# EAGLE board Klink_Dev_Board (EAGLE 9.7.0)
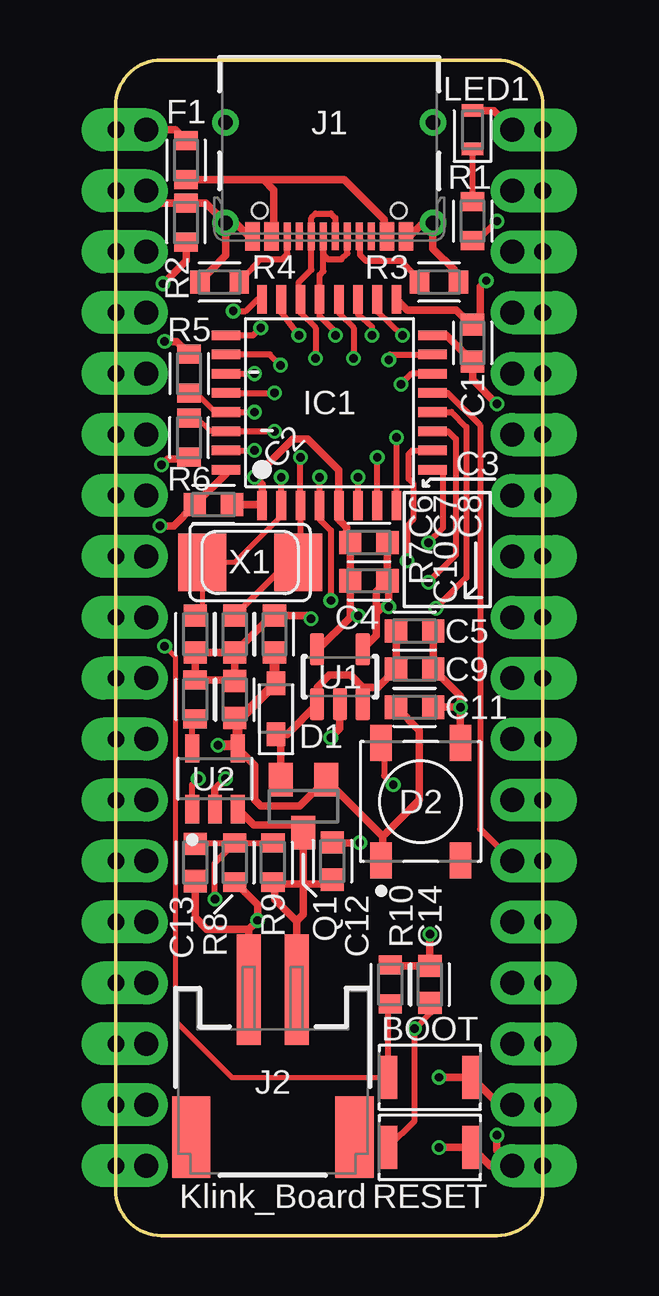
[diagram p0: board, top side]
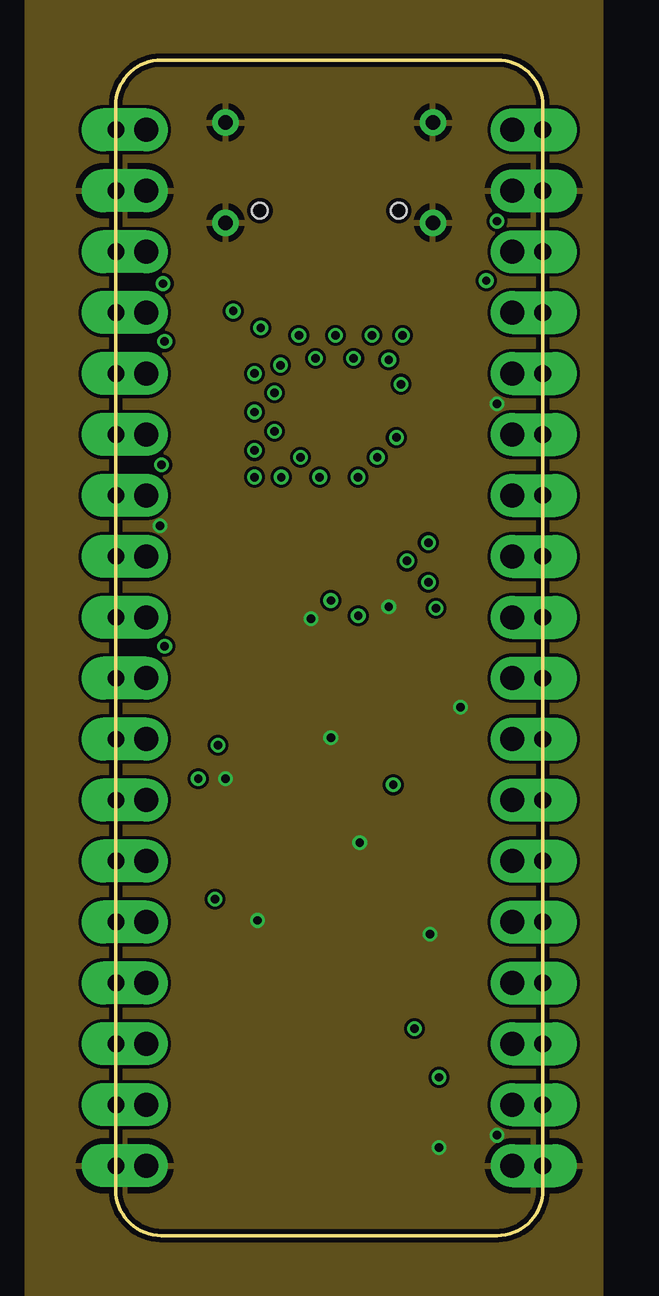
[diagram p1: board, inner layer Route2]
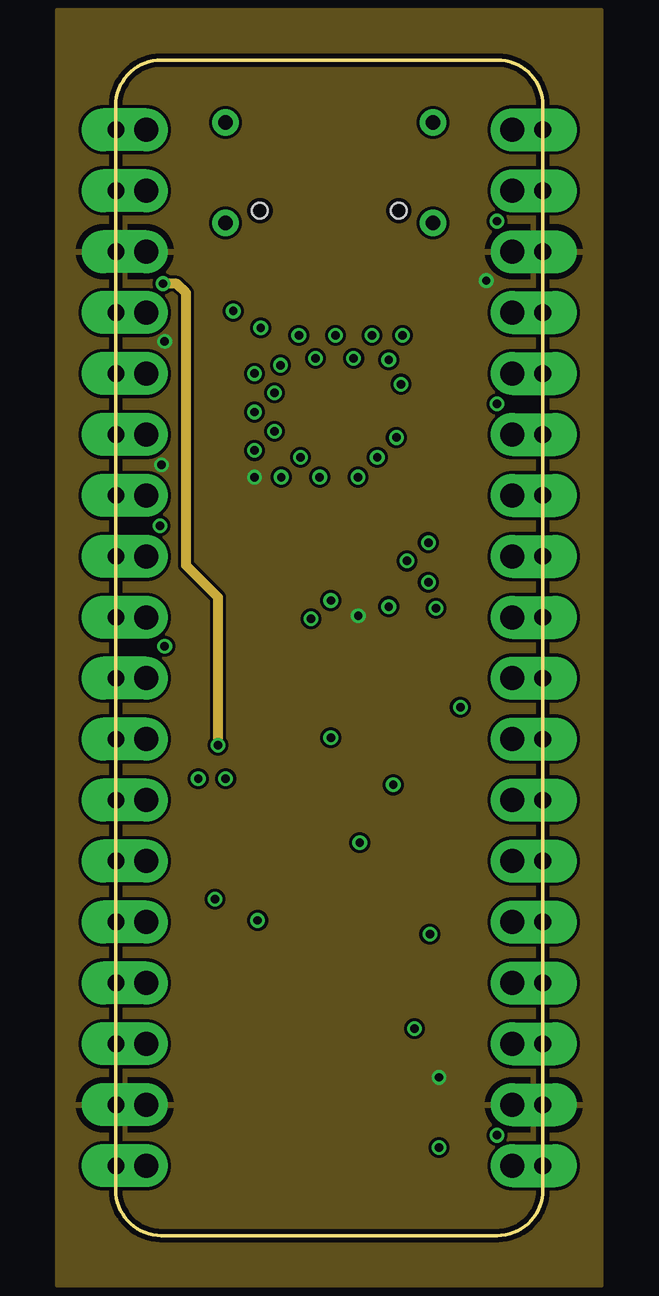
[diagram p2: board, inner layer Route15]
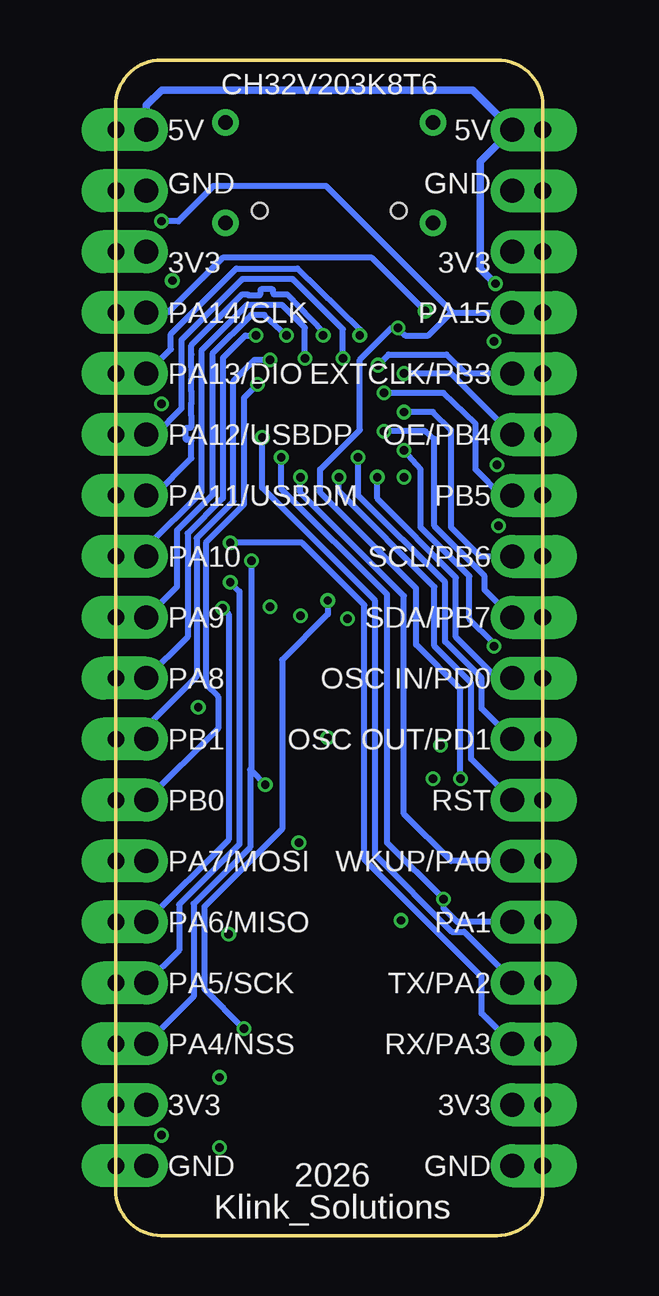
[diagram p3: board, bottom side, seen from below]

Size 17.8 x 49 mm. Coordinates in mm from the lower left corner, seen from the top.
Outline: 0,1.9 arc90 1.9,0 15.9,0 arc90 17.8,1.9 17.8,47.1 arc90 15.9,49 1.9,49 arc90 0,47.1 0,1.9
Copper layers (1+2*15+16): Top 0.035mm / dielectric 0.2mm / Route2 0.0175mm / dielectric 1.065mm / Route15 0.0175mm / dielectric 0.2mm / Bottom 0.035mm
Design rules "jlcpcb-4layers.dru": minimum track width 3.5mil, minimum drill 0.2mm, track to track 5mil, track to pad 0.2mm, pad to pad 5mil, via to via 0.5mm, smd to smd 5mil, copper to edge 0.2mm, drill to drill 6mil, minimum pad ring 10mil, minimum via ring 0.13mm, stop-mask expansion 0.05mm, vias tented up to drill 16mil, thermal gap 10mil

## Footprints (pad centres in the part's own frame; a part is rotated, then mirrored left to right if it is on the bottom)
B3U-1000P(M) = smd 0.8 x 1.8: 1 -1.75,0; 2 1.75,0
CAPC1608X85 = smd 0.921 x 0.97: 1 -0.775,0; 2 0.775,0
SODFL2513X70 = smd 0.985 x 0.774: 1 -1.065,0; 2 1.065,0
WS2812B = smd 1.5 x 0.9: 1 -2.45,1.65; 2 -2.45,-1.65; 3 2.45,-1.65; 4 2.45,1.65
FUSC1608X60N = smd 0.799 x 0.974: 1 -0.815,0; 2 0.815,0
LQFP32-7X7 = smd 1.2 x 0.4: 1 -4.3,2.8; 2 -4.3,2; 3 -4.3,1.2; 4 -4.3,0.4; 5 -4.3,-0.4; 6 -4.3,-1.2; 7 -4.3,-2; 8 -4.3,-2.8; 17 4.3,-2.8; 18 4.3,-2; 19 4.3,-1.2; 20 4.3,-0.4; 21 4.3,0.4; 22 4.3,1.2; 23 4.3,2; 24 4.3,2.8 | smd 0.4 x 1.2: 9 -2.8,-4.3; 10 -2,-4.3; 11 -1.2,-4.3; 12 -0.4,-4.3; 13 0.4,-4.3; 14 1.2,-4.3; 15 2,-4.3; 16 2.8,-4.3; 25 2.8,4.3; 26 2,4.3; 27 1.2,4.3; 28 0.4,4.3; 29 -0.4,4.3; 30 -1.2,4.3; 31 -2,4.3; 32 -2.8,4.3
629722000214 = smd 0.3 x 1.15: A1 -3.35,4.745; A4 -2.55,4.745; A5 -1.25,4.745; A6 -0.25,4.745; A7 0.25,4.745; A8 1.25,4.745; A9 2.55,4.745; A12 3.35,4.745; B1 3.05,4.745; B4 2.25,4.745; B5 1.75,4.745; B6 0.75,4.745; B7 -0.75,4.745; B8 -1.75,4.745; B9 -2.25,4.745; B12 -3.05,4.745 | drill 0.6 pad 1 slot 1.7 rotated 90: S1 -4.32,4.18; S2 4.32,4.18 | drill 0.6 pad 1 slot 1.4 rotated 90: S3 -4.32,0; S4 4.32,0 | hole 0.65: -2.89,3.68; 2.89,3.68
S2B-PH-SM4-TB = smd 4.6 x 1: 1 -3.84,1; 2 -3.84,-1 | smd 3.4 x 1.6: NC1 2.3,3.4; NC2 2.3,-3.4
LEDC1608X39N_R = smd 0.512 x 0.912: 1 -0.8,0; 2 0.8,0
SOT23 = smd 1 x 1.4: 1 -0.95,-1.1; 2 0.95,-1.1; 3 0,1.1
RESC1608X60 = smd 0.799 x 0.974: 1 -0.815,0; 2 0.815,0
SOT-23-5 = smd 1.32 x 0.59: 1 -1.145,0.95; 2 -1.145,0; 3 -1.145,-0.95; 4 1.145,-0.95; 5 1.145,0.95
SOT95P280X110-5 = smd 1.179 x 0.572: 1 -1.264,0.95; 2 -1.264,0; 3 -1.264,-0.95; 4 1.264,-0.95; 5 1.264,0.95
HYBRID_THROUGH_HOLE = drill 1 pad 1.7 offset: 0 -7.62,21.59; 1 -7.62,19.05; 2 -7.62,16.51; 3 -7.62,13.97; 4 -7.62,11.43; 5 -7.62,8.89; 6 -7.62,6.35; 7 -7.62,3.81; 8 -7.62,1.27; 9 -7.62,-1.27; 10 -7.62,-3.81; 11 -7.62,-6.35; 12 -7.62,-8.89; 13 -7.62,-11.43; 14 -7.62,-13.97; 15 -7.62,-16.51; 16 -7.62,-19.05; 17 -7.62,-21.59; 18 7.62,-21.59; 19 7.62,-19.05; 20 7.62,-16.51; 21 7.62,-13.97; 22 7.62,-11.43; 23 7.62,-8.89; 24 7.62,-6.35; 25 7.62,-3.81; 26 7.62,-1.27; 27 7.62,1.27; 28 7.62,3.81; 29 7.62,6.35; 30 7.62,8.89; 31 7.62,11.43; 32 7.62,13.97; 33 7.62,16.51; 34 7.62,19.05; 35 7.62,21.59
NX5032 = smd 2 x 2.4: P$1 2,0; P$2 -2,0

## Placement (x,y rotation side)
BOOT  B3U-X000B3U-1000P(M)1000P(M)  [B3U-1000P(M)]  13.09,6.59 0 top
C1  0.1uF  [CAPC1608X85]  14.87,37.2 90 top
C2  0.1uF  [CAPC1608X85]  4.07,30.47 0 top
C3  0.1uF  [CAPC1608X85]  10.55,28.88 0 top
C4  2.2uF  [CAPC1608X85]  10.55,27.29 180 top
C5  2.2uF  [CAPC1608X85]  12.46,25.2 180 top
C6  18pF  [CAPC1608X85]  3.31,25.07 270 top
C7  18pF  [CAPC1608X85]  4.96,25.07 270 top
C8  0.1uF  [CAPC1608X85]  6.61,25.07 270 top
C9  2.2uF  [CAPC1608X85]  12.46,23.61 180 top
C10  4.7uF  [CAPC1608X85]  4.96,22.34 90 top
C11  0.1uF  [CAPC1608X85]  12.46,22.02 180 top
C12  4.7uF  [CAPC1608X85]  9.03,15.61 90 top
C13  0.1uF  [CAPC1608X85]  3.31,15.55 90 top
C14  0.1uF  [CAPC1608X85]  13.09,10.47 90 top
D1  DIODE_DO-219-AC(SOD323F)  [SODFL2513X70]  6.68,21.96 90 top
D2  WS2812B  [WS2812B]  12.71,18.09 90 top
F1  FUSE_CHIP-0603(1608-METRIC)  [FUSC1608X60N]  2.93,44.82 90 top
IC1  CH32V203K8T6LQFP32  [LQFP32-7X7]  8.9,34.72 90 top
J1  629722000214  [629722000214]  8.9,46.39 180 top
J2  S2B-PH-SM4-TB  [S2B-PH-SM4-TB]  6.55,6.4 270 top
LED1  LED-RED  [LEDC1608X39N_R]  14.87,46.09 90 top
Q1  PMOSFET_SOT23-GSD  [SOT23]  7.82,17.9 180 top
R1  220  [RESC1608X60]  14.87,42.28 90 top
R2  100k  [RESC1608X60]  2.93,42.22 270 top
R3  5.1k  [RESC1608X60]  13.47,39.74 0 top
R4  5.1k  [RESC1608X60]  4.33,39.74 0 top
R5  4.7k  [RESC1608X60]  3.06,35.93 90 top
R6  4.7k  [RESC1608X60]  3.06,33.26 270 top
R7  10K  [RESC1608X60]  3.31,22.34 270 top
R8  1M  [RESC1608X60]  4.96,15.55 90 top
R9  1M  [RESC1608X60]  6.55,15.55 90 top
R10  4.7k  [RESC1608X60]  11.44,10.47 270 top
RESET  B3U-X000B3U-1000P(M)1000P(M)  [B3U-1000P(M)]  13.09,3.67 180 top
U1  TLV75733PDBVRDBV0005A_N  [SOT-23-5]  9.34,23.29 90 top
U2  MCP73831T-2ACI/OT_SOT23-5  [SOT95P280X110-5]  4.14,19.04 90 top
U$1  KLINK_BAORDHYBRID_THROUGH_HOLE  [HYBRID_THROUGH_HOLE]  8.9,24.5 0 top
X1  8mHz  [NX5032]  5.6,28.06 0 top

## Library data of the parts
BOOT RESET = Switch; CATEGORY: Switches; DATASHEET: https://omronfs.omron.com/en_US/ecb/products/pdf/en-b3u.pdf; DESCRIPTION: Tactile Switch SPST-NO Top Actuated Surface Mount; MANUFACTURER: Omron Electronics Inc-EMC Div; MPN: B3U-1000PM; OPERATING_TEMPERATURE: -25°C ~ 70°C; PACKAGE_SIZE: NA; PACKAGE_TYPE: SMD; PART_STATUS: ACTIVE; ROHS: COMPLIANT; SERIES: B3U; SUBCATEGORY: Tactile Switches; TYPE: SPST-NO
C1-C14 = Capacitor; CATEGORY: Capacitor; PACKAGE_SIZE: 0603; PACKAGE_TYPE: Surface Mount; SUBCATEGORY: Ceramic Capacitors; TYPE: MLCC
D1 = Diode; CATEGORY: Diode; DESCRIPTION: Generic diode Surface Mount DO-219-AC(SOD323F); PACKAGE_SIZE: SOD323F; PACKAGE_TYPE: Surface Mount; SUBCATEGORY: Rectifiers
D2 = LED; CATEGORY: LED; COLOR: RGB; DATASHEET: https://cdn-shop.adafruit.com/datasheets/WS2812B.pdf; DESCRIPTION: RGB LED chip 5050 Package; MANUFACTURER: Worldsemi; MPN: WS2812B; OPERATING_TEMPERATURE: -55°C ~ 150°C; PACKAGE_SIZE: 5050; PACKAGE_TYPE: Surface Mount; PART_STATUS: Active; ROHS: Compliant; SERIES: WS2812B; SUBCATEGORY: Chip LED Addressable; TYPE: Square with Flat Top
F1 = Circuit-Protection; CATEGORY_L1: Circuit Protection; CATEGORY_L2: Fuses; CATEGORY_L3: Board Mount (Cartridge Style Excluded); PACKAGE: Surface Mount; PACKAGE_SIZE: 0603
IC1 = WCH CH32V203
J1 = Wurth_Connectors_WR-USB; APPLICATION: USB 2.0; DATASHEET: https://www.we-online.com/redexpert/spec/629722000214?ae; GERDER: Receptacle; INTERFACE-TYPE: Type C; IR: 5 A; MOUNT: SMT; PACKAGING: Tape and Reel; PART-NUMBER: 629722000214; PCB-THICKNESS: 0.8 mm; PINS: 16pcs; TYPE: Horizontal; WORKING-VOLTAGE: 48 V (DC)
J2 = Connector; CATEGORY_L1: Connectors; CATEGORY_L3: Right Angle; DATASHEET: https://www.jst-mfg.com/product/pdf/eng/ePH.pdf; DESCRIPTION: Connector Header Surface Mount Right Angle 2 position 0.079" (2.00mm); MANUFACTURER: JST Sales America Inc.; MPN: S2B-PH-SM4-TB; OPERATING_TEMPERATURE: -25°C ~ 85°C; PACKAGE: Surface Mount; PACKAGE_SIZE: NA; PART_STATUS: Active; PITCH: 0.079" (2.00mm); ROHS: Compliant; SERIES: PH
LED1 = Tutorial - Fusion 360; CATEGORY: Opto-Electronic; COLOR: Red; SUB-CATEGORY: LED
Q1 = Transistor; CATEGORY: Transistor; DATASHEET: https://www.analog.com/media/en/package-pcb-resources/package/pkg_pdf/ltc-legacy-sot-23/sot3%2005-08-1631%20rev%20d.pdf; DESCRIPTION: Generic P-Channel MOSFET Surface Mount SOT23 Package; PACKAGE_SIZE: SOT23; PACKAGE_TYPE: Surface Mount; SUBCATEGORY: MOSFET; TYPE: P-Channel
R1-R10 = Resistor; CATEGORY: Resistors; DESCRIPTION: Chip Resistor 1.60 X 0.82 X 0.60 mm body 0603(1608-METRIC) Package; PACKAGE_SIZE: 0603; PACKAGE_TYPE: Surface Mount
U1 = 2026-07-09_23-18-33_Library; DATASHEET: https://www.ti.com/lit/gpn/tlv757p; TYPE: TYPE
U2 = IC_Power-Management; CATEGORY_L1: Power Management IC; CATEGORY_L2: Battery Chargers; CATEGORY_L3: Lithium Ion/Polymer; DATASHEET: https://ww1.microchip.com/downloads/en/DeviceDoc/MCP73831-Family-Data-Sheet-DS20001984H.pdf; DESCRIPTION: Charger IC Lithium Ion/Polymer SOT-23-5; INPUT_VOLTAGE: 6V; MANUFACTURER: Microchip Technology; MPN: MCP73831T-2ACI/OT; OPERATING_TEMPERATURE: -40°C ~ 85°C; OUTPUT_CURRENT: 500mA; OUTPUT_VOLTAGE: 4.2V; PACKAGE: Surface Mount; PACKAGE_SIZE: SOT-23-5; PART_STATUS: Active; ROHS: Compliant; SERIES: MCP73831; THERMALLOSS: 1.54 W; TOPOLOGY: NA
U$1 = Klink Board
X1 = adafruit

## Nets
BOOT: BOOT.1 IC1.31 R10.2
EXTCLK: IC1.26 U$1.4
GND [POWER]: C1.1 C2.1 C3.2 C4.1 C5.1 C6.2 C7.2 C8.1 C9.1 C10.2 C11.1 C12.2 C13.1 C14.2 D2.3 IC1.16 IC1.32 J1.A1 J1.A12 J1.B1 J1.B12 J1.S1 J1.S2 J1.S3 J1.S4 J2.2 R2.1 R3.2 R4.1 R7.1 R8.1 R10.1 RESET.1 U1.2 U1.4 U2.2 U$1.1 U$1.17 U$1.18 U$1.34
MISO: IC1.12 U$1.22
MOSI: IC1.13 U$1.23
N$1: J1.B5 R4.2
N$2: J1.A5 R3.1
N$19: LED1.1 R1.2
NSS: D2.4 IC1.10 U$1.20
OE: IC1.27 U$1.5
OSC_IN/PD0: C6.1 IC1.2 U$1.9 X1.P$2
OSC_OUT/PD1: C7.1 IC1.3 U$1.10 X1.P$1
PA1/CHARGE: C13.2 IC1.7 R8.2 R9.2 U$1.13
PA8: IC1.18 U$1.26
PA9: IC1.19 U$1.27
PA10: IC1.20 U$1.28
PA15/STAT: IC1.25 R1.1 U2.1 U$1.3
PB0: IC1.14 U$1.24
PB1: IC1.15 U$1.25
PB5: IC1.28 U$1.6
PROG: R7.2 U2.5
RST: C14.1 IC1.4 RESET.2 U$1.11
RX: IC1.9 U$1.15
SCK: IC1.11 U$1.21
SCL: IC1.29 R5.1 U$1.7
SDA: IC1.30 R6.1 U$1.8
SWCLK: IC1.24 U$1.32
SWDIO: IC1.23 U$1.31
TX: IC1.8 U$1.14
USB_D_N: IC1.21 J1.A7 J1.B7 U$1.29
USB_D_P: IC1.22 J1.A6 J1.B6 U$1.30
USB_FUSED_5V [POWER]: C8.2 C10.1 C11.2 D1.2 D2.1 F1.2 LED1.2 Q1.1 R2.2 U2.4 U$1.0 U$1.35
VBAT1 [POWER]: C12.1 J2.1 Q1.3 R9.1 U2.3
VBATSAFE [POWER]: C5.2 C9.2 D1.1 Q1.2 U1.1 U1.3
VCC_3V3 [POWER]: BOOT.2 C1.2 C2.2 C3.1 C4.2 IC1.1 IC1.5 IC1.17 R5.2 R6.2 U1.5 U$1.2 U$1.16 U$1.19 U$1.33
VUSB [POWER]: F1.1 J1.A4 J1.A9 J1.B4 J1.B9
WKUP: IC1.6 U$1.12

## Tracks (layer width: path | path; a pad name or v marks a point on that pad's centre or on a via)
BOOT  (via drill 0.35)
  Top 0.203: v2.04,24.56 2.49,24.12 2.49,8.94 4.84,6.59 BOOT.1
  Top 0.254: R10.2 11.34,9.55 BOOT.1 | IC1.31 v5.79,32.72
  Bottom 0.254: v2.04,24.56 2.04,24.69 3.06,25.71 3.06,27.48 5.09,29.52 5.09,31.93 v5.79,32.72
EXTCLK  (via drill 0.35)
  Top 0.254: v6.87,36.28 6.42,36.72 IC1.26
  Bottom 0.254: U$1.4 3.19,35.93 4.01,36.72 6.42,36.72 v6.87,36.28
GND  (via drill 0.35)
  Top 0.305: v13.47,3.67 RESET.1 15.6,2.91 U$1.18 15.89,3.55 v15.89,4.18 | v13.09,12.56 C14.2 11.48,11.24 R10.1 | C12.2 v10.17,16.37 | J1.A1 12.82,42.22 J1.S1 13.22,41.14 14.1,40.26 R3.2 | J1.A12 4.99,42.22 J1.S2 | C11.1 v14.36,22.02 | U2.2 4.14,18.59 v4.58,19.04 | v8.96,20.75 9.35,21.13 U1.2 | U1.4 10.87,25.01 10.87,25.96 | 10.87,25.96 10.87,26.83 C4.1 | v14.36,22.02 14.36,22.48 C9.1 C5.1 | D2.3 v14.36,22.02 | C4.1 C3.2 | C7.2 C10.2 4.92,23.16 R7.1 C6.2 C7.2 | C7.2 6.51,25.85 C8.1 8,25.85 v8.14,25.71 | U$1.1 1.8,43.03 R2.1 3.76,43.03 J1.S2 | R4.1 4.58,40.87 J1.S2 | C13.1 3.31,13.26 3.8,12.77 5.55,12.77 | IC1.16 13.77,37.52 C1.1 14.87,35.68 v15.89,34.66 | IC1.32 4.6,31.77 C2.1 2.41,29.58 v1.85,29.58 | C4.1 11.38,27.29 v11.38,26.21 11.12,26.21 10.87,25.96 | R8.1 5.92,13.78 v5.92,13.13 5.55,12.77 | J2.2 5.55,12.77
  pour Route2: -3.72,-3.36 20.25,-3.36 20.25,52.36 -3.72,52.36
MISO  (via drill 0.35)
  Top 0.254: IC1.12 14,34.32 14.62,33.71 14.62,27.42 v13.35,26.15
  Bottom 0.254: v13.35,26.15 13.09,25.9 13.09,16.5 U$1.22
MOSI
  Top 0.254: IC1.13 13.83,35.12 15.19,33.77 15.19,16.94 U$1.23
N$1
  Top 0.254: R4.2 6.03,40.69 6.93,40.69 7.15,40.91 J1.B5
N$2
  Top 0.254: J1.A5 10.17,41.63 10.17,40.88 10.42,40.63 11.89,40.63 12.47,40.06 R3.1
N$4  (via drill 0.7)
  other vias: 0.01,46.09
N$6  (via drill 0.7)
  other vias: 0.01,43.55
N$7  (via drill 0.7)
  other vias: 0.01,41.01
N$8  (via drill 0.7)
  other vias: 0.01,38.47
N$19
  Top 0.254: R1.2 LED1.1
N$21  (via drill 0.7)
  other vias: 0.01,35.93
N$22  (via drill 0.7)
  other vias: 0.01,33.39
N$23  (via drill 0.7)
  other vias: 0.01,30.85
N$24  (via drill 0.7)
  other vias: 0.01,28.31
N$25  (via drill 0.7)
  other vias: 0.01,25.77
N$26  (via drill 0.7)
  other vias: 0.01,23.23
N$27  (via drill 0.7)
  other vias: 0.01,20.69
N$28  (via drill 0.7)
  other vias: 0.01,18.15
N$29  (via drill 0.7)
  other vias: 0.01,15.61
N$30  (via drill 0.7)
  other vias: 0.01,13.07
N$31  (via drill 0.7)
  other vias: 0.01,10.53
N$32  (via drill 0.7)
  other vias: 0.01,7.99
N$46  (via drill 0.7)
  other vias: 0.01,5.45
N$47  (via drill 0.7)
  other vias: 0.01,2.91
N$48  (via drill 0.7)
  other vias: 17.79,2.91
N$49  (via drill 0.7)
  other vias: 17.79,5.45
N$63  (via drill 0.7)
  other vias: 17.79,7.99
N$64  (via drill 0.7)
  other vias: 17.79,10.53
N$65  (via drill 0.7)
  other vias: 17.79,13.07
N$66  (via drill 0.7)
  other vias: 17.79,15.61
N$67  (via drill 0.7)
  other vias: 17.79,18.15
N$68  (via drill 0.7)
  other vias: 17.79,20.69
N$69  (via drill 0.7)
  other vias: 17.79,23.23
N$70  (via drill 0.7)
  other vias: 17.79,25.77
N$71  (via drill 0.7)
  other vias: 17.79,28.31
N$72  (via drill 0.7)
  other vias: 17.79,30.85
N$73  (via drill 0.7)
  other vias: 17.79,33.39
N$74  (via drill 0.7)
  other vias: 17.79,35.93
N$75  (via drill 0.7)
  other vias: 17.79,38.47
N$76  (via drill 0.7)
  other vias: 17.79,41.01
N$77  (via drill 0.7)
  other vias: 17.79,43.55
N$78  (via drill 0.7)
  other vias: 17.79,46.09
NSS  (via drill 0.35)
  Top 0.254: v12.14,28.12 12.14,29.58 12.39,29.83 12.39,31.36 12.2,31.55 12.2,32.56 12.36,32.72 IC1.10 | D2.4 11.19,20.41 11.19,19.17 v11.57,18.79
  Bottom 0.254: 12.14,19.36 v12.14,28.12 | U$1.20 14.55,9.96 14.55,13.83 12.2,16.18 12.2,19.42 12.14,19.36 | v11.57,18.79 12.14,19.36
OE  (via drill 0.35)
  Top 0.254: IC1.27 v5.79,35.93
  Bottom 0.254: U$1.5 3.82,35.93 v5.79,35.93
OSC_IN/PD0  (via drill 0.35)
  Top 0.203: IC1.2 6.9,29.99 4.96,28.06 X1.P$2 3.6,26.13 C6.1
  Top 0.254: IC1.2 v6.9,31.61
  Bottom 0.254: U$1.9 1.92,23.23 3.63,24.95 3.63,27.42 6.9,30.72 v6.9,31.61
OSC_OUT/PD1  (via drill 0.35)
  Top 0.254: v7.7,32.44 IC1.3 7.7,28.16 X1.P$1 7.17,28.06 C7.1
  Bottom 0.254: U$1.10 2.55,21.96 2.55,23.23 4.07,24.75 4.07,27.23 7.7,30.85 v7.7,32.44
PA1/CHARGE  (via drill 0.35)
  Top 0.254: R8.2 R9.2 | C13.2 3.35,16.36 R8.2 | v4.14,14.02 4.14,15.54 R8.2 | IC1.7 v10.9,32.44
  Bottom 0.254: v10.9,32.44 10.9,31.11 6.49,26.72 6.49,16.37 v4.14,14.02 4.14,13.64 3.57,13.07 U$1.13
PA8  (via drill 0.35)
  Top 0.254: IC1.18 10.9,38.5 v11.95,37.52
  Bottom 0.254: U$1.26 14.8,24.95 14.8,29.26 13.33,30.74 13.33,36.58 12.39,37.52 v11.95,37.52
PA9  (via drill 0.35)
  Top 0.254: IC1.19 10.1,38.39 10.68,37.88 v10.68,37.52
  Bottom 0.254: v10.68,37.52 11.61,38.37 12.16,38.37 13.77,36.75 13.77,30.87 15.25,29.39 15.25,27.04 U$1.27
PA10  (via drill 0.35)
  Top 0.254: IC1.20 9.3,38.45 9.92,37.84 v9.92,36.56
  Bottom 0.254: v9.92,36.56 9.92,37.84 10.87,38.79 12.33,38.79 14.23,36.88 14.23,30.98 16.52,28.69 U$1.28
PA15/STAT  (via drill 0.35)
  Top 0.254: IC1.25 5.73,37.52 v6.04,37.84 | R1.1 15.07,41.47 v15.89,42.28 | U2.1 3.19,18.79 v3.44,19.04
  Bottom 0.254: 3.82,38.47 4.77,37.52 5.73,37.52 v6.04,37.84 6.3,37.84 7.63,36.5 7.63,33.58 9.28,31.93 9.28,30.98 5.28,26.98 5.28,24.63 3.44,22.79 v3.44,19.04 | 3.82,38.47 3.79,38.5 9.03,43.74 13.73,43.74 15.19,42.28 v15.89,42.28 | 3.82,38.47 U$1.3
PB0  (via drill 0.35)
  Top 0.254: IC1.14 12.32,35.92 v11.88,35.49
  Bottom 0.254: v11.88,35.49 12.46,34.91 12.46,30.47 14.04,28.88 14.04,22.98 13.54,22.47 13.54,21.13 U$1.24
PB1  (via drill 0.35)
  Top 0.254: IC1.15 11.42,36.72 11.2,36.5 v11.38,36.5
  Bottom 0.254: U$1.25 16.52,21.2 14.42,23.29 14.42,29.07 12.9,30.6 12.9,35.61 12.01,36.5 v11.38,36.5
PB5  (via drill 0.35)
  Top 0.254: IC1.28 v6.61,35.12
  Bottom 0.254: U$1.6 1.72,30.85 2.8,31.93 2.8,33.84 4.14,35.12 v6.61,35.12
PROG
  Top 0.254: U2.5 3.19,21.4 R7.2
RST  (via drill 0.35)
  Top 0.254: RESET.2 12.46,4.79 v12.46,8.62 13.13,9.3 13.13,9.65 C14.1 | v8.5,31.61 IC1.4 8.5,29.85 8.96,29.39 v8.96,26.47
  Bottom 0.254: U$1.11 3,19.86 3,23.04 4.52,24.56 4.52,27.03 8.5,31.04 v8.5,31.61 | v8.96,26.47 8.96,25.9 10.87,23.99 10.87,16.94 14.11,13.71 14.11,10.28 v12.46,8.62
RX  (via drill 0.35)
  Top 0.254: v13.03,28.88 13.64,29.5 13.64,31.8 13.52,31.92 IC1.9
  Bottom 0.254: U$1.15 2.55,9.26 2.55,10.78 7.44,15.67 7.44,26.28 10.04,28.88 v13.03,28.88
SCK  (via drill 0.35)
  Top 0.254: IC1.11 13.85,33.52 14.17,33.2 14.17,28.37 v13.03,27.23
  Bottom 0.254: v13.03,27.23 12.65,26.85 12.65,16.31 15.16,13.8 15.16,11.89 U$1.21
SCL  (via drill 0.35)
  Top 0.203: IC1.29 4.15,34.32 3.36,35.12 R5.1
  Top 0.254: IC1.29 v5.79,34.32
  Bottom 0.254: U$1.7 2.61,28.31 3.82,29.52 3.82,33.58 4.58,34.32 v5.79,34.32
SDA  (via drill 0.35)
  Top 0.203: IC1.30 3.93,33.52 3.38,34.08 R6.1
  Top 0.254: IC1.30 v6.61,33.52
  Bottom 0.254: U$1.8 2.42,26.91 2.42,27.48 4.52,29.58 4.52,33.2 4.9,33.52 v6.61,33.52
SWCLK  (via drill 0.35)
  Top 0.254: v4.9,38.53 5.42,38.53 5.91,39.02 IC1.24
  Bottom 0.254: v4.9,38.53 7.12,40.76 13.35,40.76 15.63,38.47 U$1.32
SWDIO  (via drill 0.35)
  Top 0.254: IC1.23 6.9,38.53 6.9,38.48 v7.63,37.52
  Bottom 0.254: U$1.31 15.5,36.95 15.5,37.58 12.77,40.31 10.23,40.31 7.63,37.77 v7.63,37.52
TX  (via drill 0.35)
  Top 0.254: v11.69,33.26 IC1.8
  Bottom 0.254: v11.69,33.26 11.69,31.17 7,26.47 7,15.86 3.79,12.66 3.28,12.66 1.28,10.66 U$1.14
USB_D_N  (via drill 0.35)
  Top 0.254: J1.B7 9.65,40.93 9.41,40.69 8.84,40.69 8.65,40.88 J1.A7 8.65,40.19 8.5,40.04 IC1.21 8.5,38.33 9.15,37.67 v9.15,37.52
  Bottom 0.254: U$1.29 16.2,30.85 14.65,32.41 14.65,33.12 14.7,33.17 14.84,33.17 14.89,33.22 14.89,33.62 14.84,33.68 14.69,33.68 14.64,33.73 14.64,34.17 14.65,34.18 14.65,34.68 14.64,34.69 14.64,35.19 14.65,35.2 14.65,35.7 14.64,35.71 14.64,36.2 14.65,36.22 14.65,36.72 14.65,37.11 12.52,39.23 12.3,39.23 12.27,39.19 11.81,39.19 11.76,39.24 11.76,39.41 11.71,39.46 11.3,39.46 11.25,39.41 11.25,39.28 11.2,39.23 10.65,39.23 9.15,37.67 v9.15,37.52
USB_D_P  (via drill 0.35)
  Top 0.254: J1.A6 9.15,42.41 8.96,42.6 8.33,42.6 8.15,42.42 J1.B6 8.15,40.26 7.63,39.74 7.63,39.09 IC1.22 7.7,38.46 8.33,37.84 v8.33,36.56
  Bottom 0.254: v8.33,36.56 8.33,37.77 10.42,39.87 12.52,39.87 15.06,37.33 15.06,34.47 16.14,33.39 U$1.30
USB_FUSED_5V  (via drill 0.35)
  Top 0.305: F1.2 2.48,46.09 U$1.0 | U$1.35 16.52,46.13 15.76,46.89 LED1.2 | U2.4 5.79,19.6 5.79,18.15 6.04,17.9 7.67,17.9 Q1.1 11.12,16.64 | v1.98,39.68 2.93,40.63 R2.2 | D2.1 11.12,15.64 11.12,16.64 | C11.2 12.65,21.06 12.65,19.55 12.65,18.17 11.12,16.64
  Top 0.406: 5.09,21.56 C10.1 | 5.09,21.56 5.22,21.56 D1.2 6.61,23.09 C8.2 | 5.09,21.56 U2.4 4.96,20.44 v4.26,20.44
  Route15 0.406: v4.26,20.44 4.26,26.59 2.93,27.93 2.93,39.3 2.55,39.68 v1.98,39.68
  Bottom 0.305: v1.98,39.68 2.61,40.31 2.61,44.76 U$1.0 2.93,47.74 15.89,47.74 16.52,47.11 U$1.35
VBAT1
  Top 0.305: U2.3 5.75,17.11 7.5,17.11 Q1.3 7.82,14.66 | 7.82,14.66 7.82,13.39 7.55,13.12 7.55,13.09 | R9.1 6.62,14.66 | 6.62,14.66 7.82,14.66 | 7.82,14.66 8.85,14.66 C12.1 | J2.1 7.55,13.09 | 7.55,13.09 6.62,14.01 6.62,14.66
VBATSAFE
  Top 0.305: 10.29,22.85 9.78,23.36 8.9,23.36 8.39,22.85 U1.1 7.14,20.89 D1.1 6.87,20.7 Q1.2 | U1.3 10.29,22.85 | C5.2 C9.2 10.92,22.85 10.29,22.85
VCC_3V3  (via drill 0.35)
  Top 0.305: v13.47,6.59 BOOT.2 15.98,5.45 U$1.19 | U1.5 8.45,24.44 9.78,25.77 C4.2 | R5.2 2.54,37.26 v2.04,37.26 | v1.92,32.12 2.17,32.37 2.98,32.37 R6.2 | C4.2 9.78,26.16 v10.11,25.83 | C4.2 C3.1 9.62,29.04 9.62,29.52 9.3,29.83 IC1.5 9.3,31.91 8.01,33.2 7.38,33.2 v5.79,31.61 6.1,31.3 IC1.1 6.05,30.47 C2.2 | IC1.17 12.14,38.58 14.19,38.58 14.79,37.98 C1.2 15.19,38.29 15.19,39.55 v15.44,39.8
  pour Route15: -2.45,-2.09 20.25,-2.09 20.25,51.09 -2.45,51.09
VUSB
  Top 0.305: F1.1 6.16,44 | 6.16,44 6.59,43.58 6.59,43.55 6.59,43.05 6.59,41.89 J1.A9 | J1.A4 11.19,41.91 11.19,42.34 9.53,44 6.16,44
WKUP  (via drill 0.35)
  Top 0.254: IC1.6 v10.1,31.61
  Bottom 0.254: U$1.12 3.82,15.61 5.79,17.58 5.79,26.66 10.1,30.97 v10.1,31.61

## Text on the board
tPlace: Klink_Board
bPlace: CH32V203K8T6 | 5V | 5V | GND | GND | 3V3 | 3V3 | PA15 | PA14/CLK | EXTCLK/PB3 | PA13/DIO | OE/PB4 | PA12/USBDP | PB5 | PA11/USBDM | SCL/PB6 | PA10 | SDA/PB7 | PA9 | OSC IN/PD0 | PA8 | OSC OUT/PD1 | PB1 | RST | PB0 | WKUP/PA0 | PA7/MOSI | PA1 | PA6/MISO | TX/PA2 | PA5/SCK | RX/PA3 | PA4/NSS | 3V3 | 3V3 | GND | 2026 | GND | Klink_Solutions